# Altium PCB ClayCounterPCB.PcbDoc
Units mm, origin at the board's own origin, x right, y up, seen from the top; angles counter-clockwise.
Board outline 65 x 46 mm, 2 copper layers (Top Layer, Bottom Layer); 35 components, 20 nets, 159 pads, 79 vias.
Unrouted connection lines stored in the file: 5.
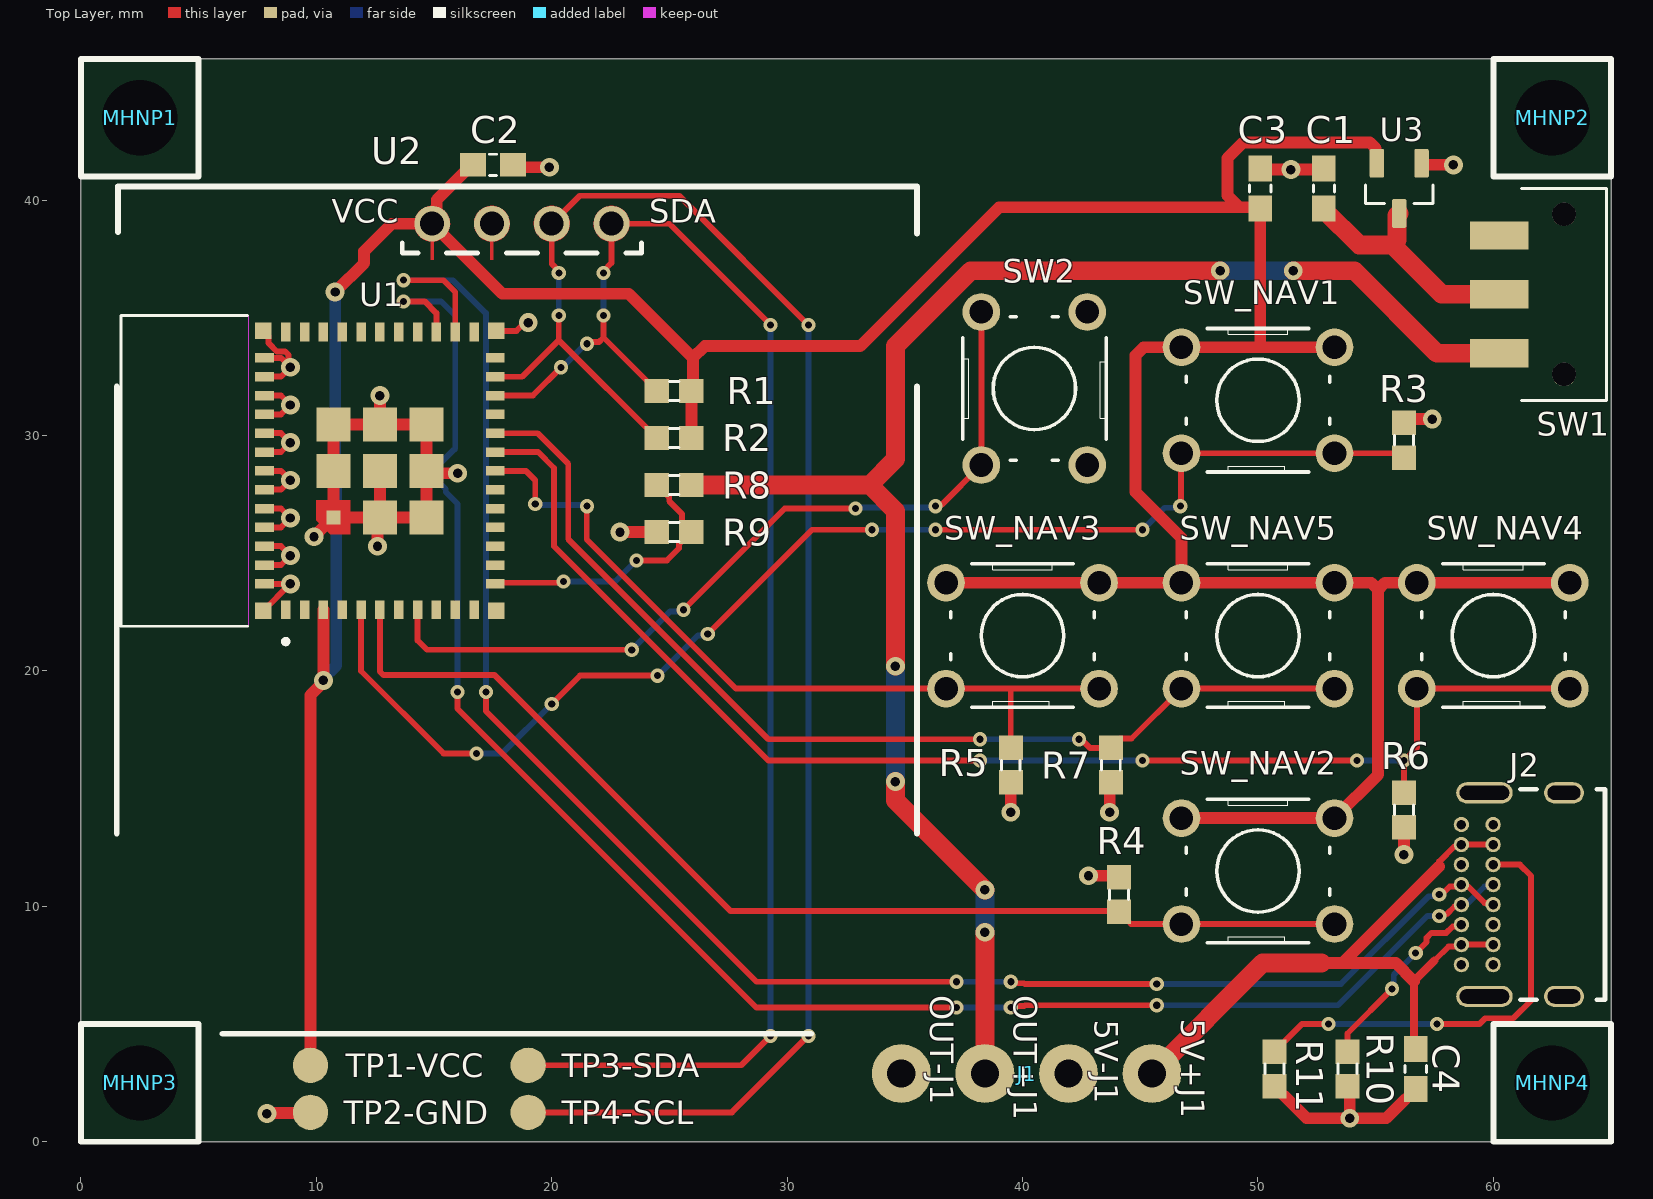
[diagram p0: Top Layer view]
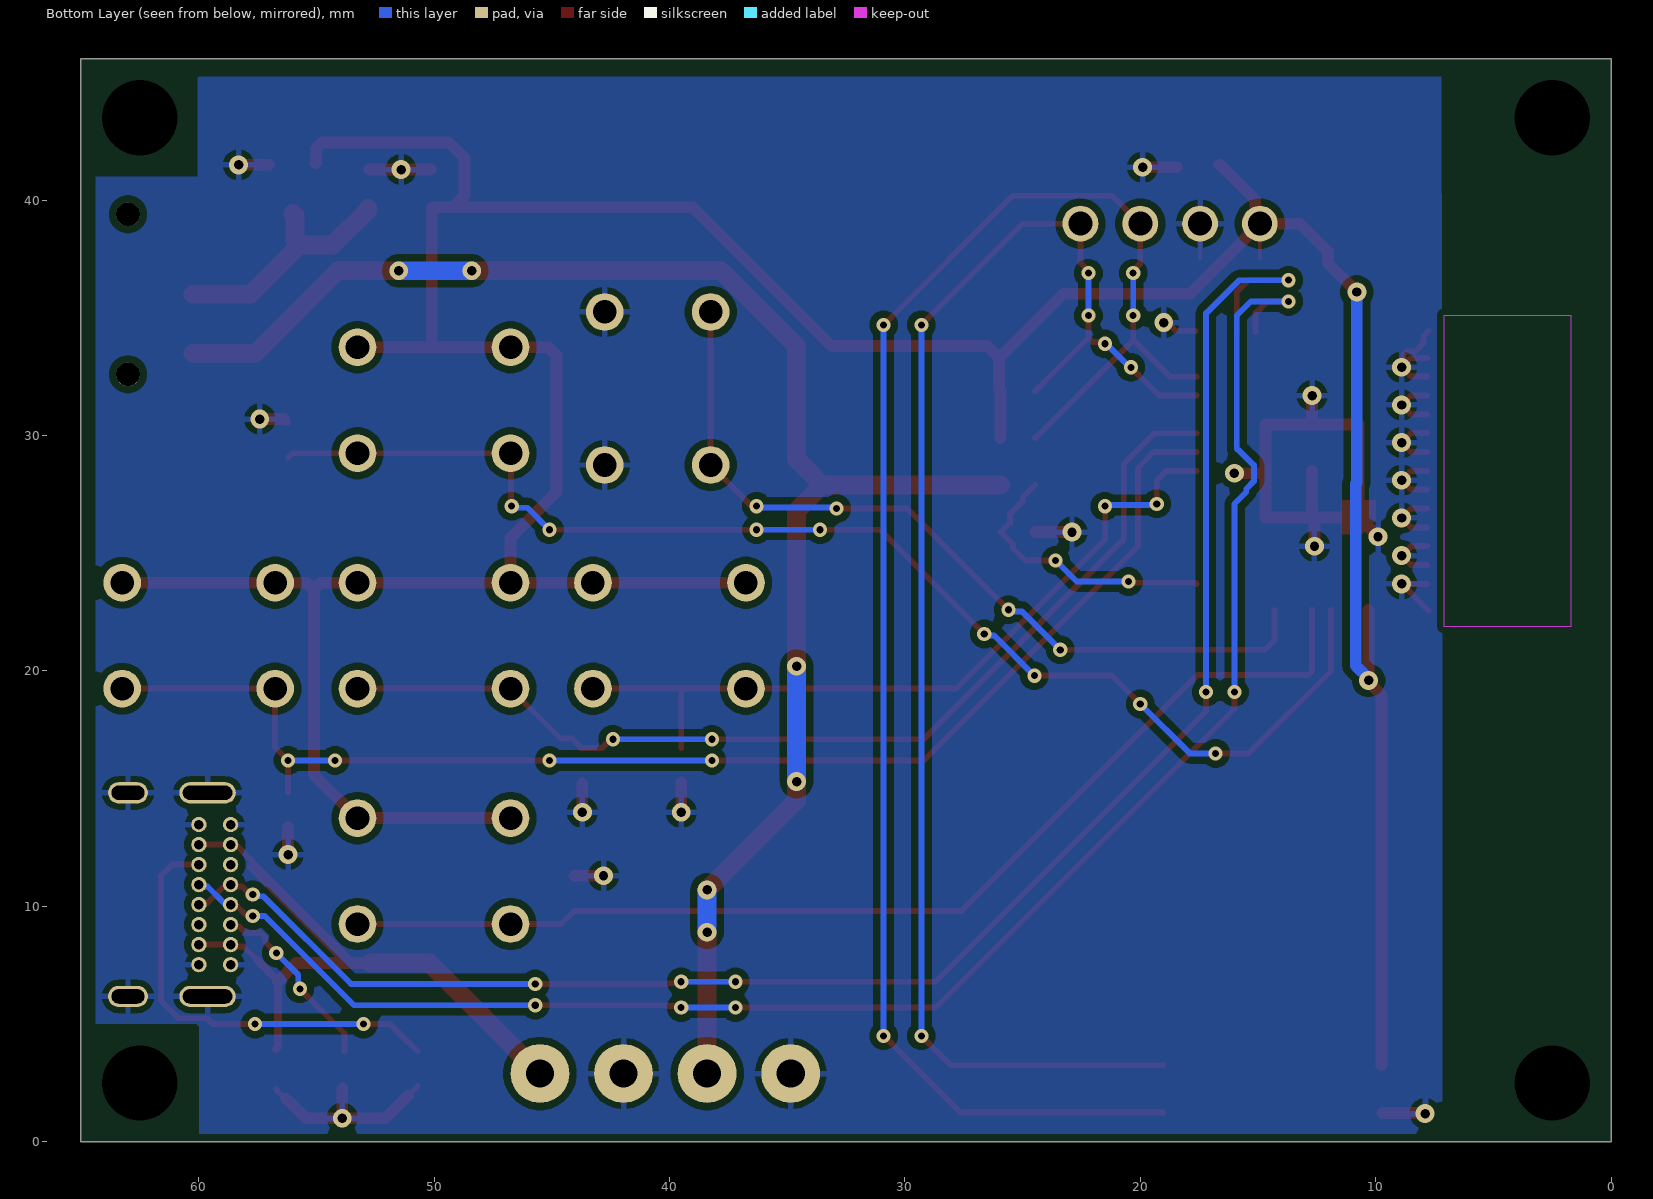
[diagram p1: Bottom Layer view, seen from below]
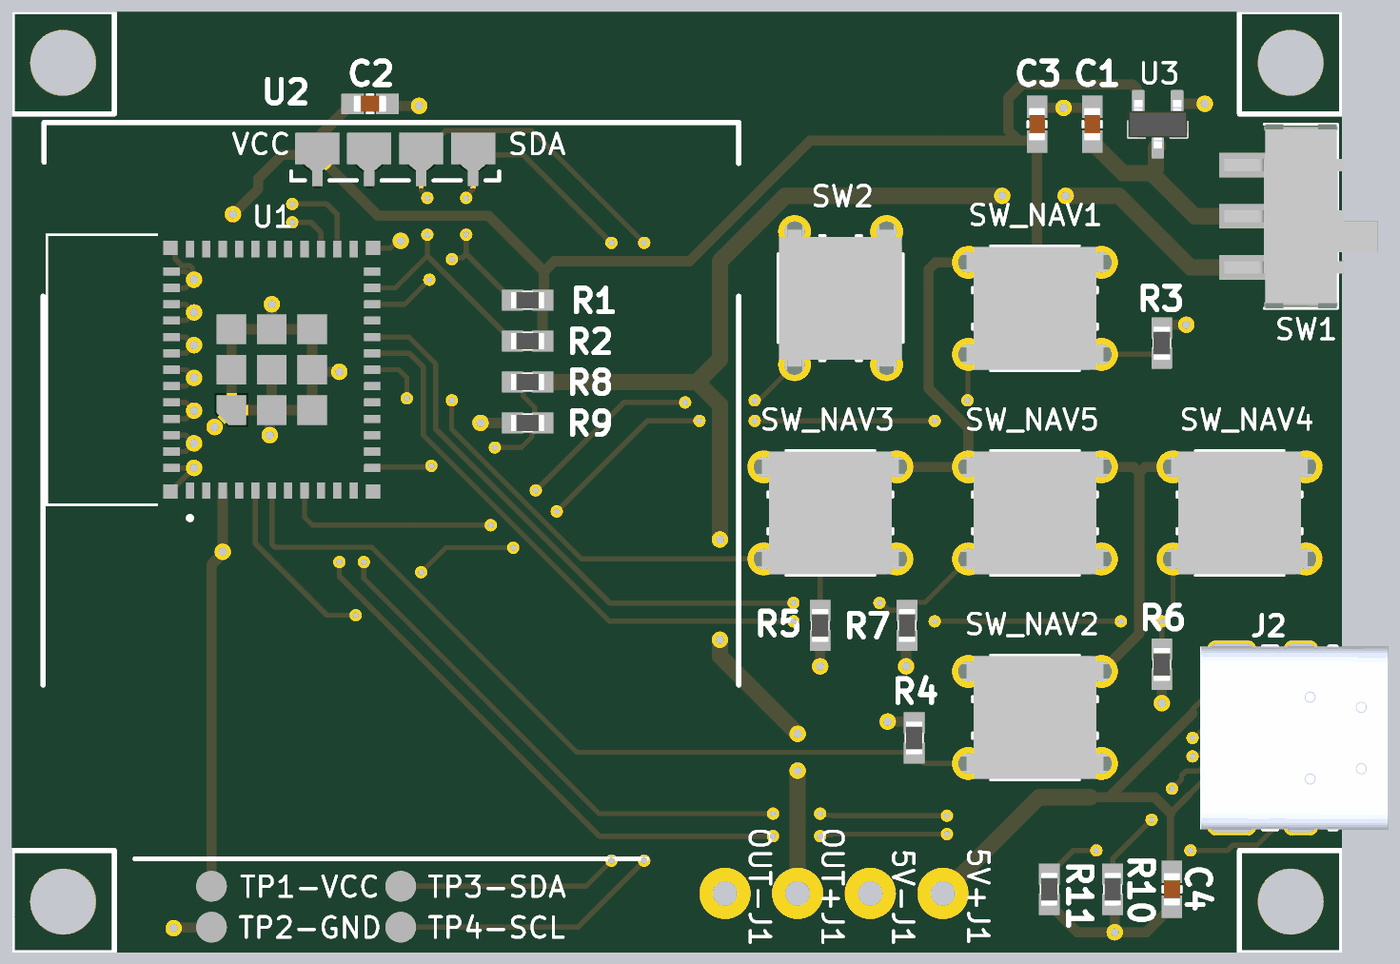
[diagram p2: 3D render of the assembled board from above, using the file's embedded part models]

## Layer stack, top to bottom
Top Solder: solder mask 0.0102, Solder Resist, Dk 3.5
Top Layer: signal copper 0.0356
Dielectric 1: dielectric 0.32, FR-4, Dk 4.8
Bottom Layer: signal copper 0.0356
Bottom Solder: solder mask 0.0102, Solder Resist, Dk 3.5

## Board outline
0,0 0,46 65,46 65,0

## Design rules (kind name [scope] priority, off if disabled: settings)
Clearance [All] p1: gap=0.3 ignorepadtopadclearanceinfootprint=TRUE
PolygonConnect [All] p1: connectstyle=Relief reliefconductorwidth=0.254 reliefentries=4 polygonreliefangle="90 Angle" airgapwidth=0.254
RoutingVias [All] p1: holewidth=0.4 width=0.8 viastyle="Through Hole" minholewidth=0.4 minwidth=0.8 maxholewidth=0.4 maxwidth=0.8
SolderMaskExpansion [All] p1: expansion=0 istentingtop=FALSE
SupplyNets "Schematic Supply Nets" [InNet('GND')] p1: voltage=0.000
Width [All] p1: maxlimit=0.8 minlimit=0.25 preferedwidth=0.8 minimp=50.000000 maximp=50.000000 favimp=50.000000
30 further rules are at their usual default settings.

## Classes and differential pairs
component class ClayCounterCircuit-V2.0: C1 C2 C3 C4 J1 MHNP1 MHNP3 MHNP4 R1 R2 R3 R4 R5 R6 R7 R8 R9 R10 R11 SW1 SW2 SW_NAV1 SW_NAV2 SW_NAV3 SW_NAV4 SW_NAV5 TP1-VCC TP2-GND TP3-SDA TP4-SCL U1 U2 U3

## Components (designator, comment, footprint, x,y, rotation, side; value= is the part's Value field where it differs from the comment)
C1 "CAP CER 10UF 16V X5R 0603" CAPC1608X90 52.8,40.5 r270 top value=10u
C2 "CAP CER 0.1UF 16V X7R 0603" CAPC1608X90 17.5,41.5 r0 top value=0.1u
C3 "CAP CER 0.1UF 16V X7R 0603" CAPC1608X90 50.1,40.5 r270 top value=0.1u
C4 "CAP SMD,0603,X5R,4.7UF,10%,16V" CAPC1608X90 56.7,3.1 r90 top value=4.7u
J1 "TP4056 Module for 18650 Li-Po Charging" TP4056 40.225,2.9 r180 top
J2 "CONN RCPT USB2.0 TYPE C 16+8POS" GCT_USB4085-GF-A_REVA4 63,10.5 r90 top locked
MHNP1 "Mounting Hole Non-Plated 3.2mm" MTHNP-3.2mm 2.5,43.5 r0 top
MHNP2 "Mounting Hole Non-Plated 3.2mm" MTHNP-3.2mm 62.5,43.5 r0 top
MHNP3 "Mounting Hole Non-Plated 3.2mm" MTHNP-3.2mm 2.5,2.5 r0 top
MHNP4 "Mounting Hole Non-Plated 3.2mm" MTHNP-3.2mm 62.5,2.5 r0 top
R1 "RES 4.7K OHM 1% 1/10W 0603" RESC1607X60N 25.2,31.9 r0 top value=4.7K
R2 "RES 4.7K OHM 1% 1/10W 0603" RESC1607X60N 25.2,29.9 r0 top value=4.7K
R3 "RES 10K OHM 1% 1/10W 0603" RESC1607X60N 56.2,29.8 r270 top value=10K
R4 "RES 10K OHM 1% 1/10W 0603" RESC1607X60N 44.1,10.5 r270 top value=10K
R5 "RES 10K OHM 1% 1/10W 0603" RESC1607X60N 39.5,16 r90 top value=10K
R6 "RES 10K OHM 1% 1/10W 0603" RESC1607X60N 56.2,14.1 r90 top value=10K
R7 "RES 10K OHM 1% 1/10W 0603" RESC1607X60N 43.75,16 r90 top value=10K
R8 "RES 100K OHM 1% 1/10W 0603" RESC1607X60N 25.2,27.9 r0 top value=100K
R9 "RES 100K OHM 1% 1/10W 0603" RESC1607X60N 25.2,25.9 r0 top value=100K
R10 "RES 5.1K OHM 1% 1/10W 0603" RESC1607X60N 53.8,3.1 r270 top value=5.1K
R11 "RES 5.1K OHM 1% 1/10W 0603" RESC1607X60N 50.7,3.1 r270 top value=5.1K
SW1 "SWITCH SLIDE SPDT 300MA 6V" SW_JS102011SAQN 63,36 r90 top
SW2 "SWITCH TACTILE SPST-NO 0.05A 24V" SW_B3F-1000 40.5,32 r90 top
SW_NAV1 "SWITCH TACTILE SPST-NO 0.05A 24V" SW_B3F-1000 50,31.5 r0 top locked
SW_NAV2 "SWITCH TACTILE SPST-NO 0.05A 24V" SW_B3F-1000 50,11.5 r0 top locked
SW_NAV3 "SWITCH TACTILE SPST-NO 0.05A 24V" SW_B3F-1000 40,21.5 r0 top locked
SW_NAV4 "SWITCH TACTILE SPST-NO 0.05A 24V" SW_B3F-1000 60,21.5 r0 top locked
SW_NAV5 "SWITCH TACTILE SPST-NO 0.05A 24V" SW_B3F-1000 50,21.5 r0 top locked
TP1-VCC "Test Point" TestPoint 9.75,3.25 r90 top
TP2-GND "Test Point" TestPoint 9.75,1.25 r90 top
TP3-SDA "Test Point" TestPoint 19,3.25 r90 top
TP4-SCL "Test Point" TestPoint 19,1.25 r90 top
U1 "RF TXRX MOD BT WIFI PCB TH SMD" XCVR_ESP32-C3-MINI-1-N4 10,28.5 r90 top locked
U2 "GRAPHIC DISPLAY OLED WHITE 1.3\"" "4 Pin Header TH - 2.54mm" 18.522,40.59 r0 top locked
U3 "IC REG LINEAR 3.3V 250MA SOT23-3" SOT95P237X112-3N 56,40.5 r270 top

## Footprints (in the part's own frame and the unit in brackets; to place one, negate y for a bottom-side part, rotate by r counter-clockwise, add the part's x,y. Pads: shape width x height; smd on the part's side, far side on the other; paste and mask are expansions set on the pad)
"4 Pin Header TH - 2.54mm" [mm]
  round 1.52 hole 1.02: 1(-3.602,-1.59) 2(-1.062,-1.59) 3(1.478,-1.59) 4(4.018,-1.59)
  Top Layer region: -0.983,-0.834 -0.904,-0.847 -0.827,-0.867 -0.753,-0.896 -0.682,-0.932 -0.615,-0.975 -0.553,-1.025 -0.497,-1.081 -0.447,-1.143 -0.404,-1.21 -0.368,-1.281 -0.339,-1.355 -0.319,-1.432 -0.306,-1.511 -0.302,-1.59 -0.303,-1.628 -0.306,-1.666 -0.31,-1.703 -0.317,-1.741 -0.325,-1.777 -0.335,-1.814 -0.347,-1.849 -0.361,-1.884 -0.376,-1.919 -0.393,-1.953 -0.412,-1.985 -0.432,-2.017 -0.454,-2.048 -0.477,-2.077 -0.502,-2.106 -0.528,-2.133 -0.556,-2.159 -0.585,-2.183 -0.614,-2.206 -0.645,-2.228 -0.677,-2.248 -0.71,-2.266 -0.744,-2.282 -0.779,-2.297 -0.814,-2.311 -0.85,-2.322 -0.886,-2.332 -0.923,-2.34 -0.96,-2.346 -0.997,-2.35 -0.997,-3.12 -1.127,-3.12 -1.127,-2.35 -1.164,-2.346 -1.201,-2.34 -1.238,-2.332 -1.274,-2.322 -1.31,-2.311 -1.345,-2.297 -1.38,-2.282 -1.414,-2.266 -1.447,-2.248 -1.479,-2.228 -1.51,-2.206 -1.539,-2.183 -1.568,-2.159 -1.596,-2.133 -1.622,-2.106 -1.647,-2.077 -1.67,-2.048 -1.692,-2.017 -1.712,-1.985 -1.731,-1.953 -1.748,-1.919 -1.763,-1.884 -1.777,-1.849 -1.789,-1.814 -1.799,-1.777 -1.807,-1.741 -1.814,-1.703 -1.818,-1.666 -1.821,-1.628 -1.822,-1.59 -1.818,-1.511 -1.805,-1.432 -1.785,-1.355 -1.756,-1.281 -1.72,-1.21 -1.677,-1.143 -1.627,-1.081 -1.571,-1.025 -1.509,-0.975 -1.442,-0.932 -1.371,-0.896 -1.297,-0.867 -1.22,-0.847 -1.141,-0.834 -1.062,-0.83
  Top Layer region: -3.523,-0.834 -3.444,-0.847 -3.367,-0.867 -3.293,-0.896 -3.222,-0.932 -3.155,-0.975 -3.093,-1.025 -3.037,-1.081 -2.987,-1.143 -2.944,-1.21 -2.908,-1.281 -2.879,-1.355 -2.859,-1.432 -2.846,-1.511 -2.842,-1.59 -2.843,-1.628 -2.846,-1.666 -2.85,-1.703 -2.857,-1.741 -2.865,-1.777 -2.875,-1.814 -2.887,-1.849 -2.901,-1.884 -2.916,-1.919 -2.933,-1.953 -2.952,-1.985 -2.972,-2.017 -2.994,-2.048 -3.017,-2.077 -3.042,-2.106 -3.068,-2.133 -3.096,-2.159 -3.125,-2.183 -3.154,-2.206 -3.185,-2.228 -3.217,-2.248 -3.25,-2.266 -3.284,-2.282 -3.319,-2.297 -3.354,-2.311 -3.39,-2.322 -3.426,-2.332 -3.463,-2.34 -3.5,-2.346 -3.537,-2.35 -3.537,-3.12 -3.667,-3.12 -3.667,-2.35 -3.704,-2.346 -3.741,-2.34 -3.778,-2.332 -3.814,-2.322 -3.85,-2.311 -3.885,-2.297 -3.92,-2.282 -3.954,-2.266 -3.987,-2.248 -4.019,-2.228 -4.05,-2.206 -4.079,-2.183 -4.108,-2.159 -4.136,-2.133 -4.162,-2.106 -4.187,-2.077 -4.21,-2.048 -4.232,-2.017 -4.252,-1.985 -4.271,-1.953 -4.288,-1.919 -4.303,-1.884 -4.317,-1.849 -4.329,-1.814 -4.339,-1.777 -4.347,-1.741 -4.354,-1.703 -4.358,-1.666 -4.361,-1.628 -4.362,-1.59 -4.358,-1.511 -4.345,-1.432 -4.325,-1.355 -4.296,-1.281 -4.26,-1.21 -4.217,-1.143 -4.167,-1.081 -4.111,-1.025 -4.049,-0.975 -3.982,-0.932 -3.911,-0.896 -3.837,-0.867 -3.76,-0.847 -3.681,-0.834 -3.602,-0.83
  Top Layer region: 1.557,-0.834 1.636,-0.847 1.713,-0.867 1.787,-0.896 1.858,-0.932 1.925,-0.975 1.987,-1.025 2.043,-1.081 2.093,-1.143 2.136,-1.21 2.172,-1.281 2.201,-1.355 2.221,-1.432 2.234,-1.511 2.238,-1.59 2.237,-1.628 2.234,-1.666 2.23,-1.703 2.223,-1.741 2.215,-1.777 2.205,-1.814 2.193,-1.849 2.179,-1.884 2.164,-1.919 2.147,-1.953 2.128,-1.985 2.108,-2.017 2.086,-2.048 2.063,-2.077 2.038,-2.106 2.012,-2.133 1.984,-2.159 1.955,-2.183 1.926,-2.206 1.895,-2.228 1.863,-2.248 1.83,-2.266 1.796,-2.282 1.761,-2.297 1.726,-2.311 1.69,-2.322 1.654,-2.332 1.617,-2.34 1.58,-2.346 1.543,-2.35 1.543,-3.12 1.413,-3.12 1.413,-2.35 1.376,-2.346 1.339,-2.34 1.302,-2.332 1.266,-2.322 1.23,-2.311 1.195,-2.297 1.16,-2.282 1.126,-2.266 1.093,-2.248 1.061,-2.228 1.03,-2.206 1.001,-2.183 0.972,-2.159 0.944,-2.133 0.918,-2.106 0.893,-2.077 0.87,-2.048 0.848,-2.017 0.828,-1.985 0.809,-1.953 0.792,-1.919 0.777,-1.884 0.763,-1.849 0.751,-1.814 0.741,-1.777 0.733,-1.741 0.726,-1.703 0.722,-1.666 0.719,-1.628 0.718,-1.59 0.722,-1.511 0.735,-1.432 0.755,-1.355 0.784,-1.281 0.82,-1.21 0.863,-1.143 0.913,-1.081 0.969,-1.025 1.031,-0.975 1.098,-0.932 1.169,-0.896 1.243,-0.867 1.32,-0.847 1.399,-0.834 1.478,-0.83
  Top Layer region: 4.097,-0.834 4.176,-0.847 4.253,-0.867 4.327,-0.896 4.398,-0.932 4.465,-0.975 4.527,-1.025 4.583,-1.081 4.633,-1.143 4.676,-1.21 4.712,-1.281 4.741,-1.355 4.761,-1.432 4.774,-1.511 4.778,-1.59 4.777,-1.628 4.774,-1.666 4.77,-1.703 4.763,-1.741 4.755,-1.777 4.745,-1.814 4.733,-1.849 4.719,-1.884 4.704,-1.919 4.687,-1.953 4.668,-1.985 4.648,-2.017 4.626,-2.048 4.603,-2.077 4.578,-2.106 4.552,-2.133 4.524,-2.159 4.495,-2.183 4.466,-2.206 4.435,-2.228 4.403,-2.248 4.37,-2.266 4.336,-2.282 4.301,-2.297 4.266,-2.311 4.23,-2.322 4.194,-2.332 4.157,-2.34 4.12,-2.346 4.083,-2.35 4.083,-3.12 3.953,-3.12 3.953,-2.35 3.916,-2.346 3.879,-2.34 3.842,-2.332 3.806,-2.322 3.77,-2.311 3.735,-2.297 3.7,-2.282 3.666,-2.266 3.633,-2.248 3.601,-2.228 3.57,-2.206 3.541,-2.183 3.512,-2.159 3.484,-2.133 3.458,-2.106 3.433,-2.077 3.41,-2.048 3.388,-2.017 3.368,-1.985 3.349,-1.953 3.332,-1.919 3.317,-1.884 3.303,-1.849 3.291,-1.814 3.281,-1.777 3.273,-1.741 3.266,-1.703 3.262,-1.666 3.259,-1.628 3.258,-1.59 3.262,-1.511 3.275,-1.432 3.295,-1.355 3.324,-1.281 3.36,-1.21 3.403,-1.143 3.453,-1.081 3.509,-1.025 3.571,-0.975 3.638,-0.932 3.709,-0.896 3.783,-0.867 3.86,-0.847 3.939,-0.834 4.018,-0.83
  silkscreen extent -17,-36 17,0
CAPC1608X90 [mm] "For 0603 Capacitors"
  rect 1.1x1 smd: 1(-0.85,0) 2(0.85,0)
  silkscreen extent -0.15,-0.45 0.15,0.45, body extent -0.8,-0.4 0.8,0.4, height 0.95
GCT_USB4085-GF-A_REVA4 [mm]
  round 0.65 hole 0.4: A1(-2.975,4.36) A4(-2.125,4.36) A5(-1.275,4.36) A6(-0.425,4.36) A7(0.425,4.36) A8(1.275,4.36) A9(2.125,4.36) A12(2.975,4.36) B1(2.975,3.01) B4(2.125,3.01) B5(1.275,3.01) B6(0.425,3.01) B7(-0.425,3.01) B8(-1.275,3.01) B9(-2.125,3.01) B12(-2.975,3.01)
  oval 0.9x1.7 hole 0.6 slot 1.4 at 90 deg: S1(-4.325,0) S2(4.325,0)
  oval 0.9x2.4 hole 0.6 slot 2.1 at 90 deg: S3(-4.325,3.38) S4(4.325,3.38)
  silkscreen extent -4.47,-1.74 4.47,1.85, body extent -4.47,-4.25 4.47,4.92, height 3.46
MTHNP-3.2mm [mm] "Mounting Hole Non-Plated 3.2mm Drill"
  round 1 hole 3.2: ""(0,0)
  silkscreen extent -2.5,-2.5 2.5,2.5
RESC1607X60N [mm] "For 0603 Resistors"
  rect 1.04x1.02 smd: 1(-0.735,0) 2(0.735,0)
  silkscreen extent -0.2,-0.4 0.2,0.4, body extent -0.8,-0.4 0.8,0.4, height 0.55
SOT95P237X112-3N [mm] "For: MCP1700T-3302E/TT"
  rrect25% 1.22x0.62 smd: 1(-1.065,0.95) 2(-1.065,-0.95) 3(1.065,0)
  silkscreen extent -0.14,-1.43 0.64,1.43, body extent -1.18,-1.45 1.18,1.45, height 1.12
SW_B3F-1000 [mm]
  round 1.6 hole 1: 1(-3.25,2.25) 2(3.25,2.25) 3(-3.25,-2.25) 4(3.25,-2.25)
  silkscreen extent -3.05,-3.05 3.05,3.05, body extent -3.85,-3 3.85,3, height 4.3
SW_JS102011SAQN [mm]
  rect 1.2x2.5 smd: 1(-2.5,2.75) 2(0,2.75) 3(2.5,2.75)
  round 1 hole 1 unplated: ""(-3.4,0) ""(3.4,0)
  silkscreen extent -4.5,-1.8 4.5,1.8, body extent -4.5,-3.75 4.5,3.75, height 3.22
TestPoint [mm]
  round 1.5 smd: TP*(0,0)
TP4056 [mm] "Just the pads that'll connect wire from the module itself"
  round 2.5 hole 1.2: 5V+(-5.275,0) 5V-(-1.725,0) OUT+(1.825,0) OUT-(5.375,0)
XCVR_ESP32-C3-MINI-1-N4 [mm]
  rect 0.8x0.4 smd: 1(-5.9,1.3) 2(-5.9,0.5) 3(-5.9,-0.3) 4(-5.9,-1.1) 5(-5.9,-1.9) 6(-5.9,-2.7) 7(-5.9,-3.5) 8(-5.9,-4.3) 9(-5.9,-5.1) 10(-5.9,-5.9) 11(-5.9,-6.7) 25(5.9,-6.7) 26(5.9,-5.9) 27(5.9,-5.1) 28(5.9,-4.3) 29(5.9,-3.5) 30(5.9,-2.7) 31(5.9,-1.9) 32(5.9,-1.1) 33(5.9,-0.3) 34(5.9,0.5) 35(5.9,1.3)
  rect 0.4x0.8 smd: 12(-4.8,-7.6) 13(-4,-7.6) 14(-3.2,-7.6) 15(-2.4,-7.6) 16(-1.6,-7.6) 17(-0.8,-7.6) 18(0,-7.6) 19(0.8,-7.6) 20(1.6,-7.6) 21(2.4,-7.6) 22(3.2,-7.6) 23(4,-7.6) 24(4.8,-7.6) 36(4.8,2.2) 37(4,2.2) 38(3.2,2.2) 39(2.4,2.2) 40(1.6,2.2) 41(0.8,2.2) 42(0,2.2) 43(-0.8,2.2) 44(-1.6,2.2) 45(-2.4,2.2) 46(-3.2,2.2) 47(-4,2.2) 48(-4.8,2.2)
  rect 0.6x0.6 smd paste-1 mask+0: 49_1(-1.975,-0.725)
  rect 1.45x1.45 smd: 49_2(0,-0.725) 49_3(1.975,-0.725) 49_4(1.975,-2.7) 49_5(1.975,-4.675) 49_6(0,-4.675) 49_7(-1.975,-4.675) 49_8(-1.975,-2.7) 49_9(0,-2.7)
  rect 0.7x0.7 smd: 50(5.95,2.25) 51(5.95,-7.65) 52(-5.95,-7.65) 53(-5.95,2.25)
  Top Layer region: -1.25,-1.45 -2.7,-1.45 -2.7,-0.6 -2.1,0 -1.25,0
  Keep-Out Layer region: 6.6,2.9 -6.6,2.9 -6.6,8.3 6.6,8.3
  Keep-Out Layer region: 6.6,2.9 -6.6,2.9 -6.6,8.3 6.6,8.3
  silkscreen extent -7.35,1.2 6.6,8.3

## Part data
C1: library part CC0603KRX5R7BB106, "10 µF ±10% 16V Ceramic Capacitor X5R 0603 (1608 Metric)", Package="603-2 KEMET", Supplier Part Number 1=311-3486-1-ND, Check_prices=https://www.snapeda.com/parts/C0603C104J4RACTU/KEMET/view-part/?ref=eda, MF=KEMET, MP=C0603C104J4RACTU, SnapEDA_Link=https://www.snapeda.com/parts/C0603C104J4RACTU/KEMET/view-part/?ref=snap, Supplier 1=DigiKey
C2 C3: library part C0603C104J4RACTU, "0.1 µF ±5% 16V Ceramic Capacitor X7R 0603 (1608 Metric)", Package="603-2 KEMET", Supplier Part Number 1=399-C0603C104J4RACTUCT-ND, Check_prices=https://www.snapeda.com/parts/C0603C104J4RACTU/KEMET/view-part/?ref=eda, MF=KEMET, MP=C0603C104J4RACTU, SnapEDA_Link=https://www.snapeda.com/parts/C0603C104J4RACTU/KEMET/view-part/?ref=snap, Supplier 1=DigiKey
C4: library part 0603W475K160XD, "4.7 µF ±10% 16V Ceramic Capacitor X5R 0603 (1608 Metric)"
J1: library part "TP4056 Mod", "HiLetgo TP4056 Type-c USB 5V 1A 18650 Lithium Battery Charger Module Charging Board with Dual Protection Functions"
J2: library part USB4085-GF-A, "USB-C (USB TYPE-C) USB 2.0 Receptacle Connector 24 (16+8 Dummy) Position Through Hole, Right Angle", Package=None, Supplier Part Number 1=2073-USB4085-GF-ACT-ND, Availability="In Stock", Check_prices=https://www.snapeda.com/parts/USB4085-GF-A/Global+Connector+Technology/view-part/?ref=eda, MF="Global Connector Technology", MP=USB4085-GF-A, Price=None, Purchase-URL=https://pricing.snapeda.com/search/part/USB4085-GF-A/?ref=eda, SnapEDA_Link=https://www.snapeda.com/parts/USB4085-GF-A/Global+Connector+Technology/view-part/?ref=snap, Supplier 1=DigiKey
MHNP1 MHNP2 MHNP3 MHNP4: library part MTHNP-3.2mm
R1 R2: library part RC0603FR-074K7L, "4.7 kOhms ±1% 0.1W, 1/10W Chip Resistor 0603 (1608 Metric) Moisture Resistant Thick Film", Package="0603-2 YAGEO", Supplier Part Number 1=311-4.70KHRCT-ND, Check_prices=https://www.snapeda.com/parts/RC0603FR074K7L/Yageo/view-part/?ref=eda, MF="Yageo Corporation", MP=RC0603FR074K7L, SnapEDA_Link=https://www.snapeda.com/parts/RC0603FR074K7L/Yageo/view-part/?ref=snap, Supplier 1=DigiKey
R3 R4 R5 R6 R7: library part RC0603FR-0710KL, "10 kOhms ±1% 0.1W, 1/10W Chip Resistor 0603 (1608 Metric) Moisture Resistant Thick Film", Package="0603 Yageo", Supplier Part Number 1=311-10.0KHRCT-ND, Check_prices=https://www.snapeda.com/parts/RC0603FR-0710KL/Yageo/view-part/?ref=eda, MF=Yageo, MP=RC0603FR-0710KL, SnapEDA_Link=https://www.snapeda.com/parts/RC0603FR-0710KL/Yageo/view-part/?ref=snap, Supplier 1=DigiKey
R8 R9: library part RC0603FR-07100KL, "100 kOhms ±1% 0.1W, 1/10W Chip Resistor 0603 (1608 Metric) Moisture Resistant Thick Film", Package="0603 Yageo", Supplier Part Number 1=311-100KHRCT-ND, Check_prices=https://www.snapeda.com/parts/RC0603FR-07100KL/Yageo/view-part/?ref=eda, MF=Yageo, MP=RC0603FR-07100KL, SnapEDA_Link=https://www.snapeda.com/parts/RC0603FR-07100KL/Yageo/view-part/?ref=snap, Supplier 1=DigiKey
R10 R11: library part RC0603FR-075K1L, "5.1 kOhms ±1% 0.1W, 1/10W Chip Resistor 0603 (1608 Metric) Moisture Resistant Thick Film", Package="0603 Yageo", Supplier Part Number 1=311-5.10KHRCT-ND, Check_prices=https://www.snapeda.com/parts/RC0603FR-075K1L/Yageo/view-part/?ref=eda, MF=Yageo, MP=RC0603FR-075K1L, SnapEDA_Link=https://www.snapeda.com/parts/RC0603FR-075K1L/Yageo/view-part/?ref=snap, Supplier 1=DigiKey
SW1: library part JS102011SAQN, "Slide Switch SPDT Surface Mount, Right Angle", Package=None, Check_prices=https://www.snapeda.com/parts/JS102011SAQN/C%2526K/view-part/?ref=eda, Digi-Key_Part_Number=401-1999-2-ND, MF=C&K, MP=JS102011SAQN, Purchase-URL=https://pricing.snapeda.com/search/part/JS102011SAQN/?ref=eda, SnapEDA_Link=https://www.snapeda.com/parts/JS102011SAQN/C%2526K/view-part/?ref=snap
SW2 SW_NAV1 SW_NAV2 SW_NAV3 SW_NAV4 SW_NAV5: library part B3F-1000, "Tactile Switch SPST-NO Top Actuated Through Hole", Package=None, Supplier Part Number 1=SW400-ND, Availability="In Stock", Check_prices=https://www.snapeda.com/parts/B3F-1000/Omron+Electronics+Inc-EMC+Div/view-part/?ref=eda, MF=Omron, MP=B3F-1000, Price=None, Purchase-URL=https://pricing.snapeda.com/search/part/B3F-1000/?ref=eda, SnapEDA_Link=https://www.snapeda.com/parts/B3F-1000/Omron+Electronics+Inc-EMC+Div/view-part/?ref=snap, Supplier 1=DigiKey
U1: library part ESP32-C3-MINI-1-N4, "Bluetooth, WiFi 802.11b/g/n, Bluetooth v5.0 Transceiver Module 2.412GHz ~ 2.484GHz PCB Trace Surface Mount", Package=None, Supplier Part Number 1=5407-ESP32-C3-MINI-1-N4CT-ND, Availability=Unavailable, MF="{'manufacturer': u'Espressif Systems'}", MP=ESP32-C3-MINI-1-N4, Price=None, Supplier 1=DigiKey
U2: library part 26295, "Non-Touch Graphic LCD Display Module Transmissive White OLED, Monochrome I2C 1.3\" (33.02mm) 128 x 64"
U3: library part MCP1700T-3302E/TT, "Linear Voltage Regulator IC Positive Fixed 1 Output 250mA SOT-23-3", Package="SOT-23 Microchip", Supplier Part Number 1=MCP1700T3302ETTCT-ND, Check_prices=https://www.snapeda.com/parts/MCP1700T-3302E/TT/Microchip/view-part/?ref=eda, MF=Microchip, MP=MCP1700T-3302E/TT, SnapEDA_Link=https://www.snapeda.com/parts/MCP1700T-3302E/TT/Microchip/view-part/?ref=snap, Supplier 1=DigiKey

## Via types
v1: diameter 0.6, hole 0.3, Top Layer to Bottom Layer, 48 vias
v2: diameter 0.8, hole 0.4, Top Layer to Bottom Layer, 31 vias

## Nets (pads, with @x,y where several pads share a name; then routed paths per layer and width w, separated by ;. In a path a pad name is that pad's centre, name@x,y a point inside that pad or via, vN(x,y) a via of type N, cw(c..) or ccw(c..) an arc to the next point about the centre after c; other vN are vias at no path point)
BATT_NEG: 
BATT_POS: 
BATT_SENSE: R8.1 R9.2 U1.12 | length 12
  Top Layer w0.25: U1.12 17.65,23.75 20.45,23.75 v1(20.5,23.8) ; v1(23.6,24.7) 24.896,24.7 25.41,25.214 25.41,25.385 R9.2@25.925,25.9 ; R8.1 24.475,27.9 24.99,27.385 24.99,27.214 25.54,26.664 25.54,26.285 R9.2@25.925,25.9 ; R9.2 R9.2@25.925,25.9
  Bottom Layer w0.25: v1(20.5,23.8) 22.7,23.8 v1(23.6,24.7)
CC1: J2.A5 R10.1 | length 7.9
  Top Layer w0.25: R10.1 53.8,4.6 v1(55.7,6.5) ; v1(56.7,8.023) 57.166,8.489 57.166,8.666 57.374,8.874 58,8.874 58.275,9.148 58.563,9.148 J2.A5
  Bottom Layer w0.25: v1(55.7,6.5) 55.767,6.567 55.767,7.09 v1(56.7,8.023)
CC2: J2.B5 R11.1 | length 18.9
  Top Layer w0.25: R11.1 50.7,3.845 51.085,4.23 51.095,4.23 51.865,5 v1(53,5) ; v1(57.6,5) 59.4,5 59.65,5.25 60.85,5.25 61.605,6.005 61.605,11.295 61.125,11.775 J2.B5
  Bottom Layer w0.25: v1(53,5) v1(57.6,5)
GND: C1.1 C2.2 C3.1 C4.1 J1.5V- J1.OUT- J2.A1 J2.A12 J2.B1 J2.B12 J2.S1 J2.S2 J2.S3 J2.S4 R3.1 R4.1 R5.1 R6.1 R7.1 R9.1 R10.2 R11.2 SW2.3 SW2.4 TP2-GND.TP* U1.1 U1.2 U1.11 U1.14 U1.36 U1.37 U1.38 U1.39 U1.40 U1.41 U1.42 U1.43 U1.44 U1.45 U1.46 U1.47 U1.48 U1.49_1 U1.49_2 U1.49_3 U1.49_4 U1.49_5 U1.49_6 U1.49_7 U1.49_8 U1.49_9 U1.50 U1.51 U1.52 U1.53 U2.2 U3.1 | length 69.2
  Top Layer w0.254: U1.53 v2(8.9,23.7) U1.48 ; U1.50 7.973,34.227 7.973,33.923 8.323,33.573 8.679,33.573 8.828,33.424 8.828,32.972 v2(8.9,32.9) v2@8.796,33.004 ; U1.47 8.499,24.5 v2(8.9,24.9) 8.499,25.3 U1.46 ; U1.45 8.499,26.1 v2@8.826,26.427 ; U1.44 8.499,26.9 v2(8.9,26.5) ; U1.43 8.499,27.7 v2(8.9,28.1) 8.499,28.5 U1.42 ; U1.41 8.499,29.3 v2(8.9,29.7) 8.499,30.1 U1.40 ; U1.39 8.499,30.9 v2(8.9,31.3) 8.499,31.7 U1.38 ; U1.37 8.499,32.5 v2(8.9,32.9) ; U1.36 8.499,33.3 v2@8.795,33.004 ; v2(7.9,1.2) v2@7.925,1.225 ; TP2-GND.TP*@9.725,1.225 TP2-GND.TP* ; U1.49_8@12.6,26.425 U1.49_8 ; U1.49_6 U1.49_6@14.775,28.4 ; U2.2 U2.2@17.48,38.98 ; U1.51 18.502,34.45 18.852,34.8 v2(19,34.8) ; C2.2 C2.2@18.45,41.4 ; J1.OUT-@34.85,2.775 J1.OUT- ; J1.5V-@41.95,2.775 J1.5V- ; SW2.4@42.464,35.479 42.492,35.508 SW2.4 ; R7.1@43.7,15.215 R7.1 ; R4.1@44.035,11.3 R4.1 ; C3.1 C3.1@50.15,41.3 ; R11.2 50.7,2.355 51.083,1.972 R11.2@51.093,1.972 ; C1.1@52.75,41.3 C1.1 ; R10.2 R10.2@53.9,2.265 ; R3.1 R3.1@56.365,30.7 ; C4.1@56.277,1.827 56.327,1.827 56.7,2.2 C4.1 ; U3.1 U3.1@57.015,41.5 ; J2.A1@58.632,7.525 J2.A1 ; J2.A12@58.632,13.475 J2.A12 ; J2.S4@59.499,14.704 J2.S4
  Top Layer w0.5: v2@7.925,1.225 TP2-GND.TP*@9.725,1.225 ; v2(9.9,25.7) U1.49_1 ; v2(12.6,25.3) U1.49_8@12.6,26.425 ; U1.49_9 U1.49_8 ; v2(12.7,31.7) U1.49_4 ; U1.49_6@14.775,28.4 v2(16,28.4) ; C2.2@18.45,41.4 v2(19.9,41.4) ; v2(22.9,25.9) R9.1 ; v2(39.5,14) R5.1 ; v2(42.8,11.3) R4.1@44.035,11.3 ; v2(43.7,14) R7.1@43.7,15.215 ; C3.1@50.15,41.3 v2(51.4,41.3) C1.1@52.75,41.3 ; R11.2@51.093,1.972 52.065,1 v2(53.9,1) ; R10.2@53.9,2.265 v2(53.9,1) ; v2(56.2,12.2) R6.1 ; C4.1@56.277,1.827 55.45,1 v2(53.9,1) ; R3.1@56.365,30.7 v2(57.4,30.7) ; U3.1@57.015,41.5 v2(58.3,41.5) ; U1.49_1 U1.49_8 ; U1.49_1 U1.49_2 U1.49_3 U1.49_4 ; U1.49_8 U1.49_7 U1.49_6 U1.49_5 U1.49_4
I2C_SCL: R2.1 TP4-SCL.TP* U1.23 U2.3 | length 71.4
  Top Layer w0.25: U1.23 18.745,32.5 20.3,34.055 ; TP4-SCL.TP* 27.65,1.25 v1(30.9,4.5) ; v1(20.3,35.1) 20.3,34.055 ; v1(20.3,36.9) 20.3,36.995 20,37.295 U2.3 21.185,40.185 25.415,40.185 v1(30.9,34.7) ; R2.1 24.455,29.9 20.3,34.055
  Bottom Layer w0.25: v1(20.3,35.1) v1(20.3,36.9) ; v1(30.9,4.5) v1(30.9,34.7)
I2C_SDA: R1.1 TP3-SDA.TP* U1.22 U2.4 | length 63.4
  Top Layer w0.25: U1.22 19.2,31.7 v1(20.4,32.9) ; TP3-SDA.TP* 28.05,3.25 v1(29.3,4.5) ; v1(21.5,33.9) 21.567,33.967 22.002,33.967 22.2,34.165 ; v1(22.2,35.1) 22.2,34.165 ; v1(22.2,36.9) 22.2,36.995 22.54,37.335 U2.4 25,39 v1(29.3,34.7) ; R1.1 24.455,31.9 24.07,32.285 24.07,32.295 22.2,34.165
  Bottom Layer w0.25: v1(20.4,32.9) 20.45,32.9 21.45,33.9 v1(21.5,33.9) ; v1(22.2,35.1) v1(22.2,36.9) ; v1(29.3,4.5) v1(29.3,34.7)
NAV_DOWN: R4.2 SW_NAV2.3 SW_NAV2.4 U1.6 | length 47.6
  Top Layer w0.25: U1.6 12.7,19.978 12.853,19.825 17.575,19.825 27.6,9.8 44.065,9.8 R4.2 ; R4.2@44.1,9.755 44.605,9.25 SW_NAV2.3 SW_NAV2.4
NAV_LEFT: R5.2 SW_NAV3.3 SW_NAV3.4 U1.18 | length 33.4
  Top Layer w0.25: U1.18 18.9,28.5 19.3,28.1 v1(19.3,27.1) ; v1(21.5,27) 21.489,26.989 21.489,25.589 27.828,19.25 SW_NAV3.3 39.5,19.25 ; R5.2 39.5,19.25 ; SW_NAV3.4 39.5,19.25
  Bottom Layer w0.25: v1(19.3,27.1) 19.35,27.05 21.45,27.05 v1(21.5,27)
NAV_RIGHT: R6.2 SW_NAV4.3 SW_NAV4.4 U1.19 | length 57.1
  Top Layer w0.25: U1.19 19.422,29.3 20.1,28.622 20.1,25.3 29.2,16.2 v1(38.2,16.2) ; v1(45.1,16.2) v1(54.2,16.2) ; R6.2 v1(56.2,16.2) 56.75,16.75 SW_NAV4.3 SW_NAV4.4
  Bottom Layer w0.25: v1(38.2,16.2) v1(45.1,16.2) ; v1(54.2,16.2) v1(56.2,16.2)
NAV_SELECT: R7.2 SW_NAV5.3 SW_NAV5.4 U1.20 | length 44.1
  Top Layer w0.25: U1.20 19.4,30.1 20.7,28.8 20.7,25.6 29.2,17.1 v1(38.2,17.1) ; v1(42.4,17.1) 42.495,17.1 42.86,16.735 R7.2 ; R7.2@43.75,16.745 44.135,17.13 44.63,17.13 SW_NAV5.3 SW_NAV5.4
  Bottom Layer w0.25: v1(38.2,17.1) v1(42.4,17.1)
NAV_UP: R3.2 SW_NAV1.3 SW_NAV1.4 U1.5 | length 55
  Top Layer w0.25: U1.5 11.9,20 15.4,16.5 v1(16.8,16.5) ; v1(20,18.6) 21.2,19.8 v1(24.5,19.8) ; v1(26.627,21.573) 31.054,26 v1(33.6,26) ; v1(36.3,26) v1(45.1,26) ; v1(46.7,27) 46.725,27.025 46.725,29.225 SW_NAV1.3 SW_NAV1.4 56.015,29.25 R3.2
  Bottom Layer w0.25: v1(16.8,16.5) 17.9,16.5 v1(20,18.6) ; v1(24.5,19.8) 26.206,21.506 26.56,21.506 v1(26.627,21.573) ; v1(33.6,26) v1(36.3,26) ; v1(45.1,26) 46.033,26.933 46.633,26.933 v1(46.7,27)
RAW: C1.2 SW1.2 U3.3 | length 10.5
  Top Layer w0.8: C1.2 52.8,39.6 54.3,38.1 55.7,38.1 ; U3.3 55.91,39.345 55.91,38.31 55.7,38.1 ; SW1.2 57.8,36 55.7,38.1
RST: SW2.1 SW2.2 U1.8 | length 35.2
  Top Layer w0.25: U1.8 14.3,21.3 14.7,20.9 v1(23.4,20.9) ; v1(25.6,22.6) 29.9,26.9 v1(32.9,26.9) ; v1(36.3,27) 36.367,27.067 36.567,27.067 SW2.1 SW2.2
  Bottom Layer w0.25: v1(23.4,20.9) 25.033,22.533 25.533,22.533 v1(25.6,22.6) ; v1(32.9,26.9) 32.95,26.95 36.25,26.95 v1(36.3,27)
SWITCHED_BATT: J1.OUT+ R8.2 SW1.1 | length 69.4
  Top Layer w0.8: R8.2 33.5,27.9 ; v2(34.6,15.3) 34.6,14.5 v2(38.4,10.7) ; v2(34.6,20.2) 34.6,26.8 33.5,27.9 ; J1.OUT+ v2(38.4,8.9) ; v2(48.4,37) 37.8,37 34.6,33.8 34.6,29 33.5,27.9 ; v2(51.5,37) 54.1,37 57.6,33.5 SW1.1
  Bottom Layer w0.8: v2(34.6,15.3) v2(34.6,20.2) ; v2(38.4,8.9) v2(38.4,10.7) ; v2(48.4,37) v2(51.5,37)
USB_DN: J2.A7 J2.B7 U1.26 | length 74.8
  Top Layer w0.25: v1(13.7,36.6) 15.4,36.6 15.9,36.1 U1.26 ; v1(17.2,19.1) 17.2,18.3 28.7,6.8 v1(37.2,6.8) ; v1(39.5,6.8) 39.567,6.733 40.067,6.733 40.1,6.7 v1(45.7,6.7) ; v1(57.701,10.499) 57.796,10.499 58.145,10.848 58.563,10.848 J2.A7 58.717,10.848 58.927,10.848 59.624,10.152 59.913,10.152 J2.B7
  Bottom Layer w0.25: v1(13.7,36.6) 15.8,36.6 17.2,35.2 v1(17.2,19.1) ; v1(37.2,6.8) v1(39.5,6.8) ; v1(45.7,6.7) 53.522,6.7 57.254,10.432 57.634,10.432 v1(57.701,10.499)
USB_DP: J2.A6 J2.B6 U1.27 | length 73.7
  Top Layer w0.25: v1(13.7,35.7) 14.6,35.7 15.1,35.2 U1.27 ; v1(16,19.1) 16,18.4 28.7,5.7 v1(37.2,5.7) ; v1(39.5,5.7) 39.567,5.767 40.067,5.767 40.1,5.8 v1(45.7,5.8) ; v1(57.7,9.599) 57.767,9.666 58.014,9.666 58.347,9.998 58.563,9.998 J2.A6 ; J2.B6 J2.B6@60.028,10.963
  Bottom Layer w0.25: v1(13.7,35.7) 15.3,35.7 15.9,35.1 15.9,29.446 15.854,29.4 15.833,29.4 15.175,28.742 15.175,28.058 15.5,27.733 15.5,27.6 16,27.1 v1(16,19.1) ; v1(37.2,5.7) v1(39.5,5.7) ; v1(45.7,5.8) 53.4,5.8 57.199,9.599 v1(57.7,9.599) ; J2.A6 58.717,10.152 58.927,10.152 59.624,10.848 59.913,10.848 J2.B6
VBUS_5V: C4.2 J1.5V+ J2.A4 J2.A9 J2.B4 J2.B9 | length 28.9
  Top Layer w0.25: 57.5,7.7 58.098,8.298 58.563,8.298 J2.A4 J2.B9
  Top Layer w0.254: 57.7,11.7 57.7,11.898 58.351,12.549 58.564,12.549 J2.A9 J2.B4
  Top Layer w0.35: C4.2 56.625,4.025 56.625,6.825 57.5,7.7
  Top Layer w0.5: 52.7,7.6 53.6,7.6 ; 56.625,6.825 55.85,7.6 53.6,7.6 ; 57.7,11.7 53.6,7.6
  Top Layer w0.8: J1.5V+ 50.2,7.6 52.7,7.6
VCC_3V3: C2.1 C3.2 R1.2 R2.2 SW_NAV1.1 SW_NAV1.2 SW_NAV2.1 SW_NAV2.2 SW_NAV3.1 SW_NAV3.2 SW_NAV4.1 SW_NAV4.2 SW_NAV5.1 SW_NAV5.2 TP1-VCC.TP* U1.3 U2.1 U3.2 | length 167.2
  Top Layer w0.5: TP1-VCC.TP* 9.75,18.969 10.3,19.519 v2(10.3,19.6) U1.3 ; v2(10.8,36.1) 12.029,37.329 12.029,37.829 13.2,39 U2.1 ; C2.1 16.6,41.5 15.115,40.015 15.115,39.195 U2.1 ; R2.2 R1.2 26,31.965 26,33.3 ; SW_NAV3.1 SW_NAV3.2 SW_NAV5.1 ; SW_NAV2.1 SW_NAV2.2 55.1,15.6 55.1,23.457 ; SW_NAV1.2 50,33.75 ; U3.2 55,41.615 55,42.2 54.75,42.45 49.372,42.45 48.7,41.778 48.7,40.2 49.2,39.7 ; SW_NAV4.2 SW_NAV4.1 55.393,23.75 55.1,23.457 ; U2.1 17.895,36.025 23.275,36.025 26,33.3 ; 26,33.3 26.5,33.8 33.1,33.8 39,39.7 49.2,39.7 ; SW_NAV5.1 46.75,25.65 44.8,27.6 44.8,33.407 45.143,33.75 SW_NAV1.1 50,33.75 ; SW_NAV5.1 SW_NAV5.2 54.807,23.75 55.1,23.457 ; 49.2,39.7 50.05,39.7 C3.2 50.1,33.85 50,33.75
  Bottom Layer w0.5: v2(10.3,19.6) 10.3,19.681 10.85,20.231 10.85,27.95 10.8,28 v2(10.8,36.1)
pads on no net: J2.A8 J2.B8 MHNP1. MHNP2. MHNP3. MHNP4. SW1. SW1.3 U1.4 U1.7 U1.9 U1.10 U1.13 U1.15 U1.16 U1.17 U1.21 U1.24 U1.25 U1.28 U1.29 U1.30 U1.31 U1.32 U1.33 U1.34 U1.35

## Polygon pours and split planes (outlines as drawn)
GND on Bottom Layer "GND_L02_P000" (solid, pour order 0): 7.177,28.879 7.177,0.352 49.044,0.352 49.056,0.34 49.069,0.352 59.983,0.352 59.983,4.896 60.094,5.007 64.379,5.007 64.379,41.002 60.044,41.002 60.044,45.19 59.995,45.239 7.214,45.239

## Silkscreen, mask and mechanical layers (free items; w line width, h text height)
Mechanical 1:
  the board outline again, w0.254

## Text inside footprints (layer, text, board x,y; h text height)
J1: Top Overlay "OUT+J1" at 39.625,6.225 h1 r270; Top Overlay "OUT-J1" at 36.075,6.225 h1 r270; Top Overlay "5V-J1" at 43.075,5.175 h1 r270; Top Overlay "5V+J1" at 46.75,5.225 h1 r270
J2: Mechanical 13 "PCB EDGE" at 64.57,15.815 h0.81 r90
U2: Top Overlay "VCC" at 10.65,39.05 h1; Top Overlay "SDA" at 24.15,39.05 h1